# Altium PCB ESP32-C3FH4.PcbDoc
Units mil, origin at the board's own origin, x right, y up, seen from the top; angles counter-clockwise.
Board outline 1414.34 x 2244.79 mil, 4 copper layers (Top Layer, GND, POWER, Bottom Layer), stack 30.634 mil thick; 59 components, 54 nets, 271 pads, 143 vias.
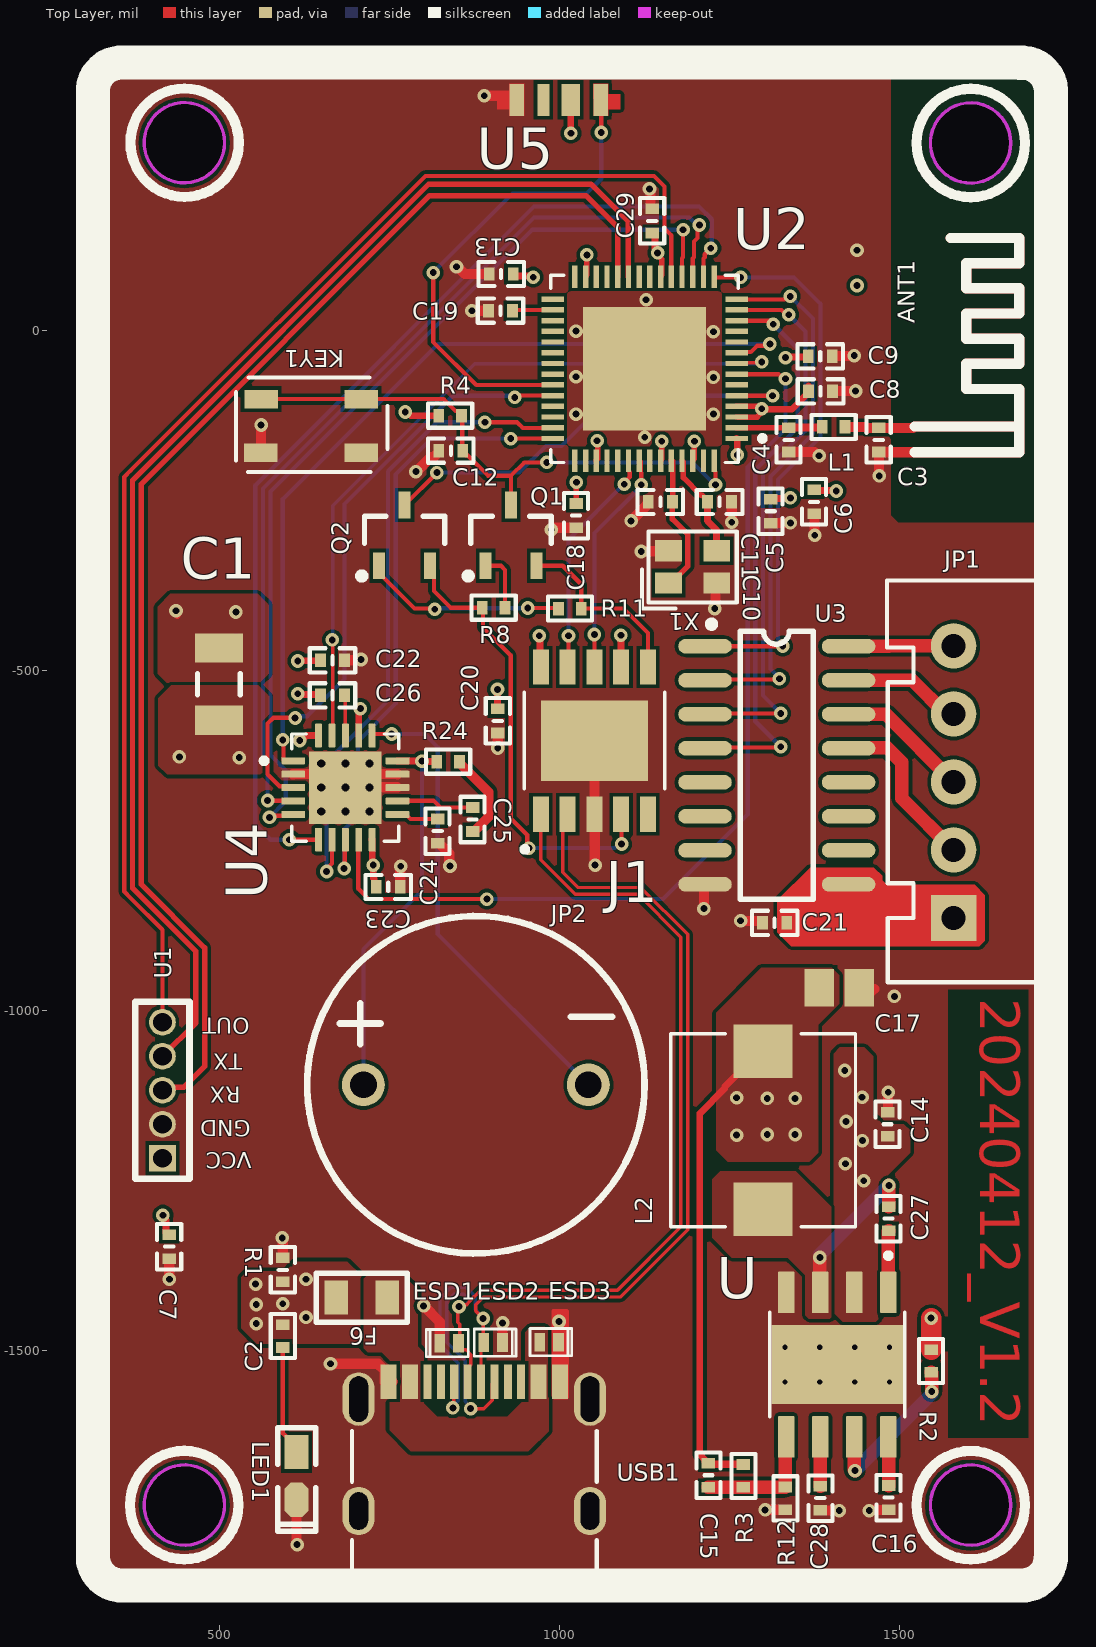
[diagram p0: Top Layer view]
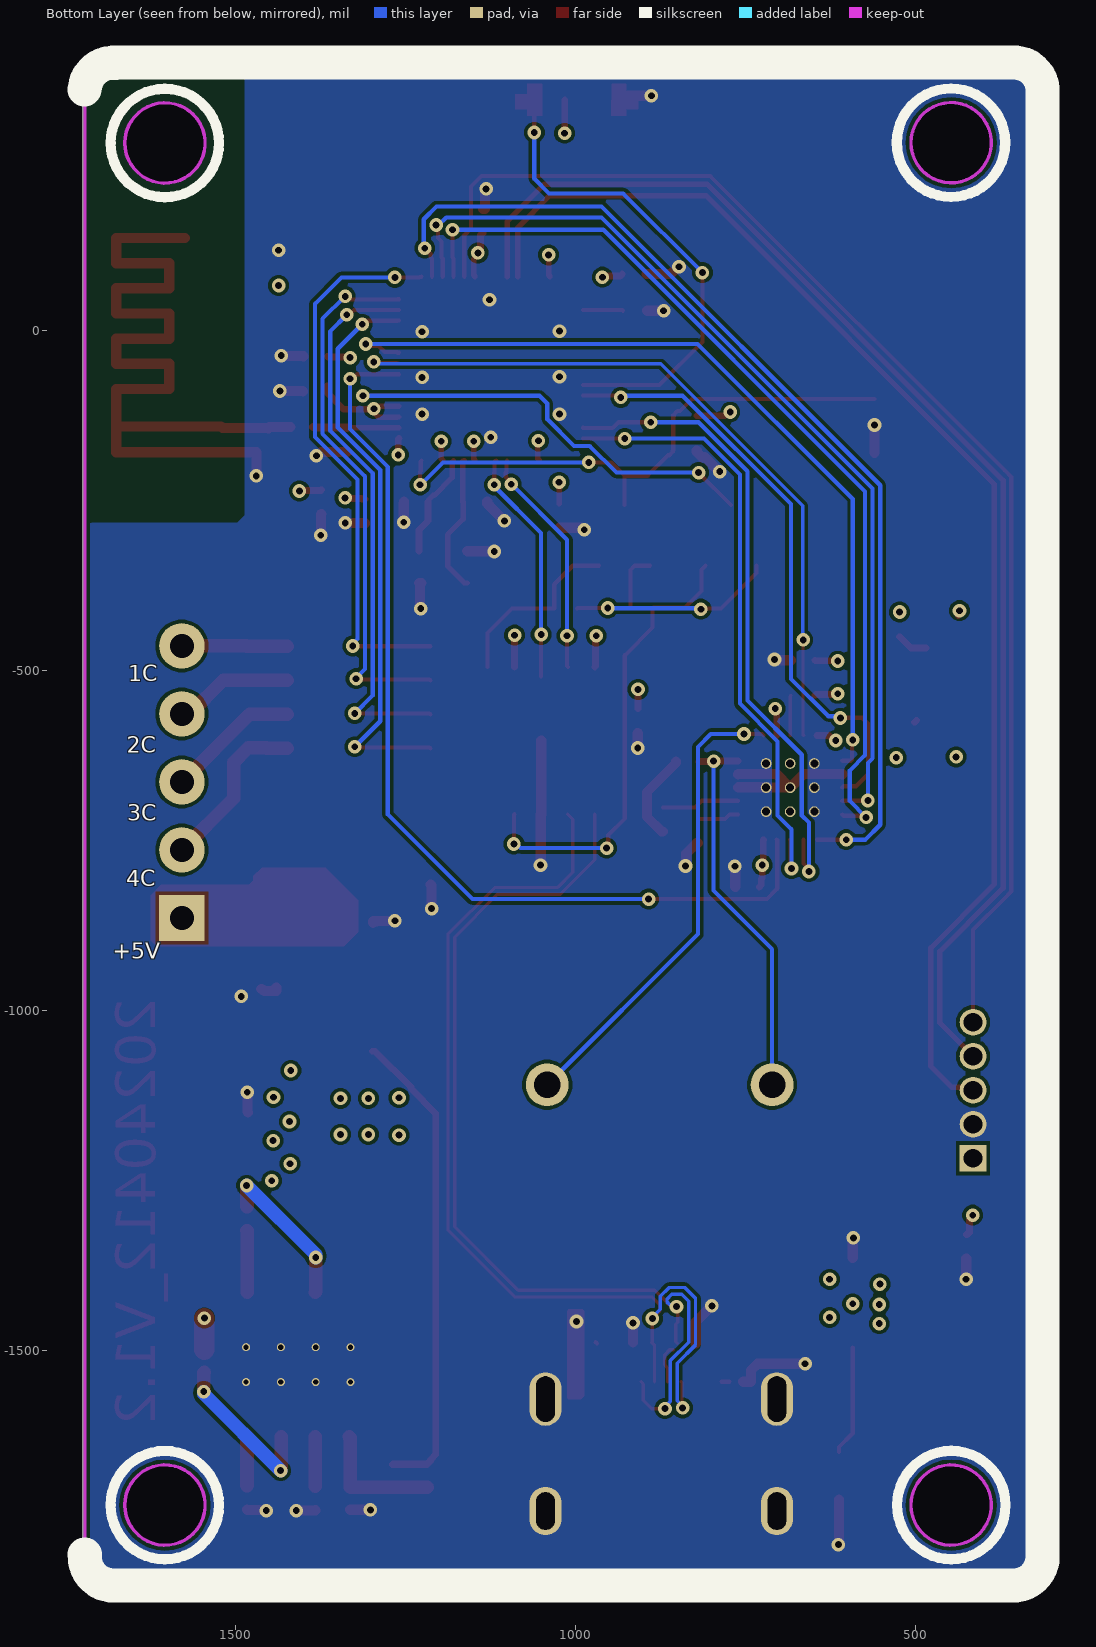
[diagram p1: Bottom Layer view, seen from below]
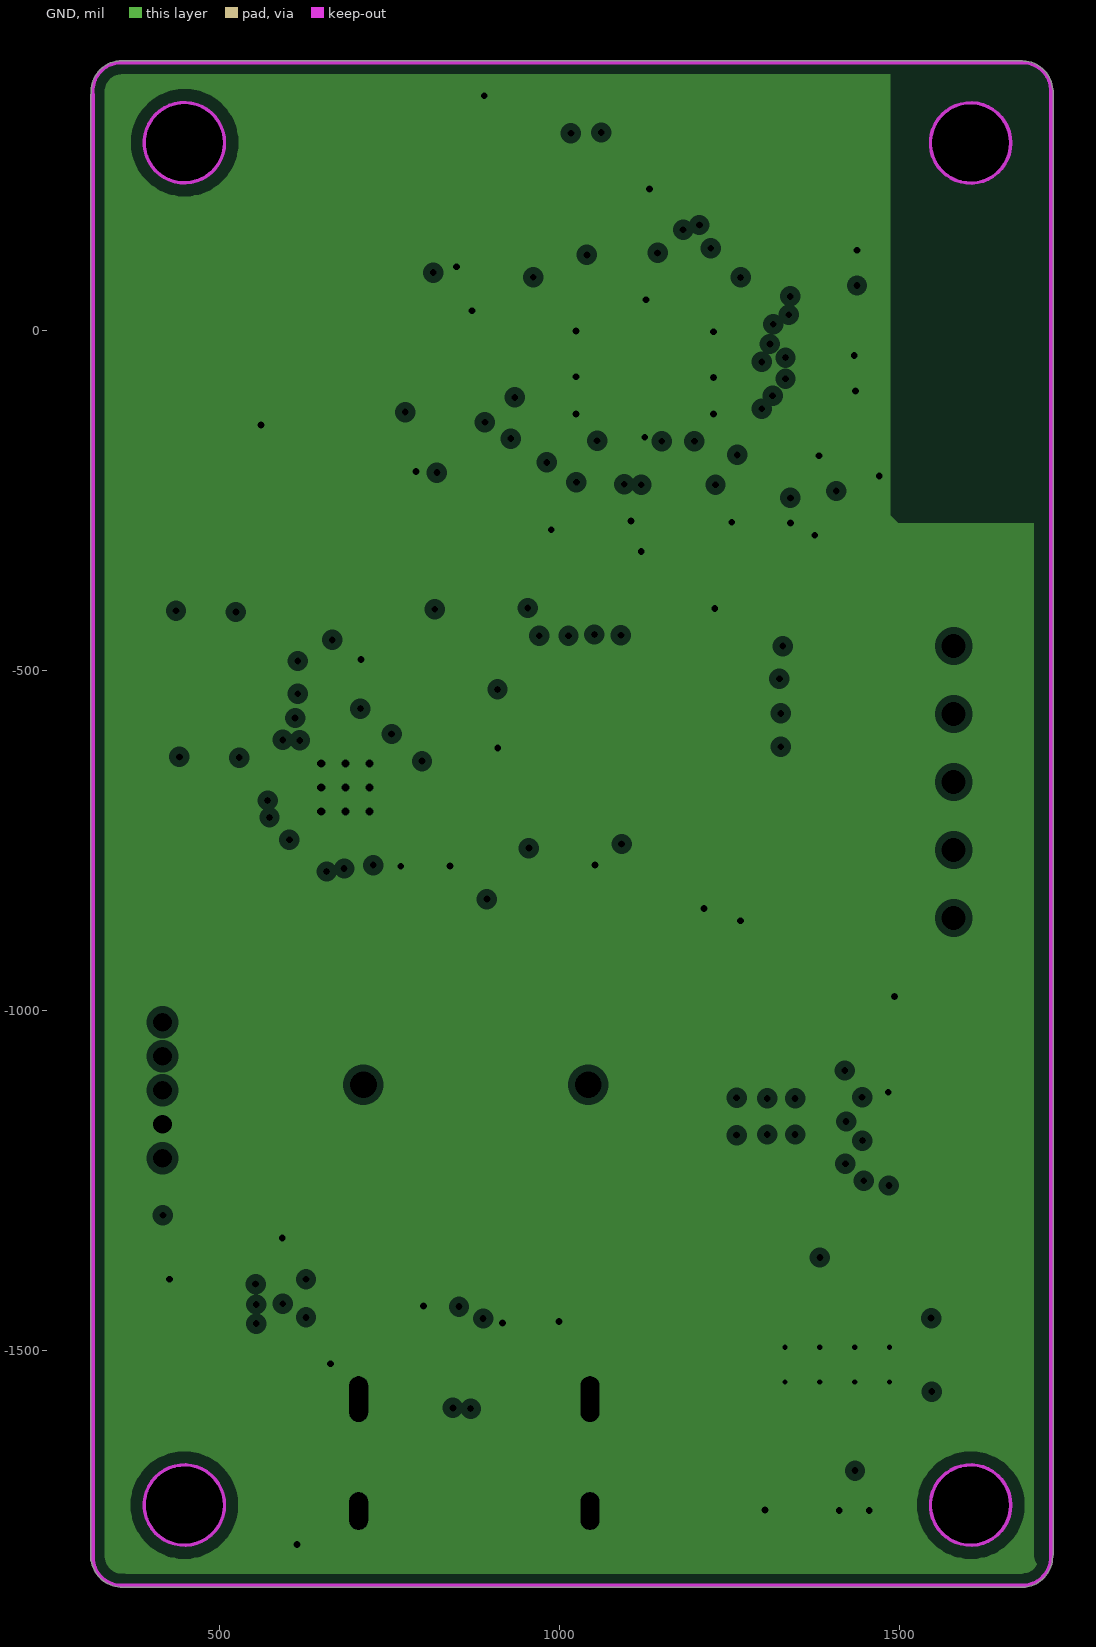
[diagram p2: GND, clearances drawn from the general rule]
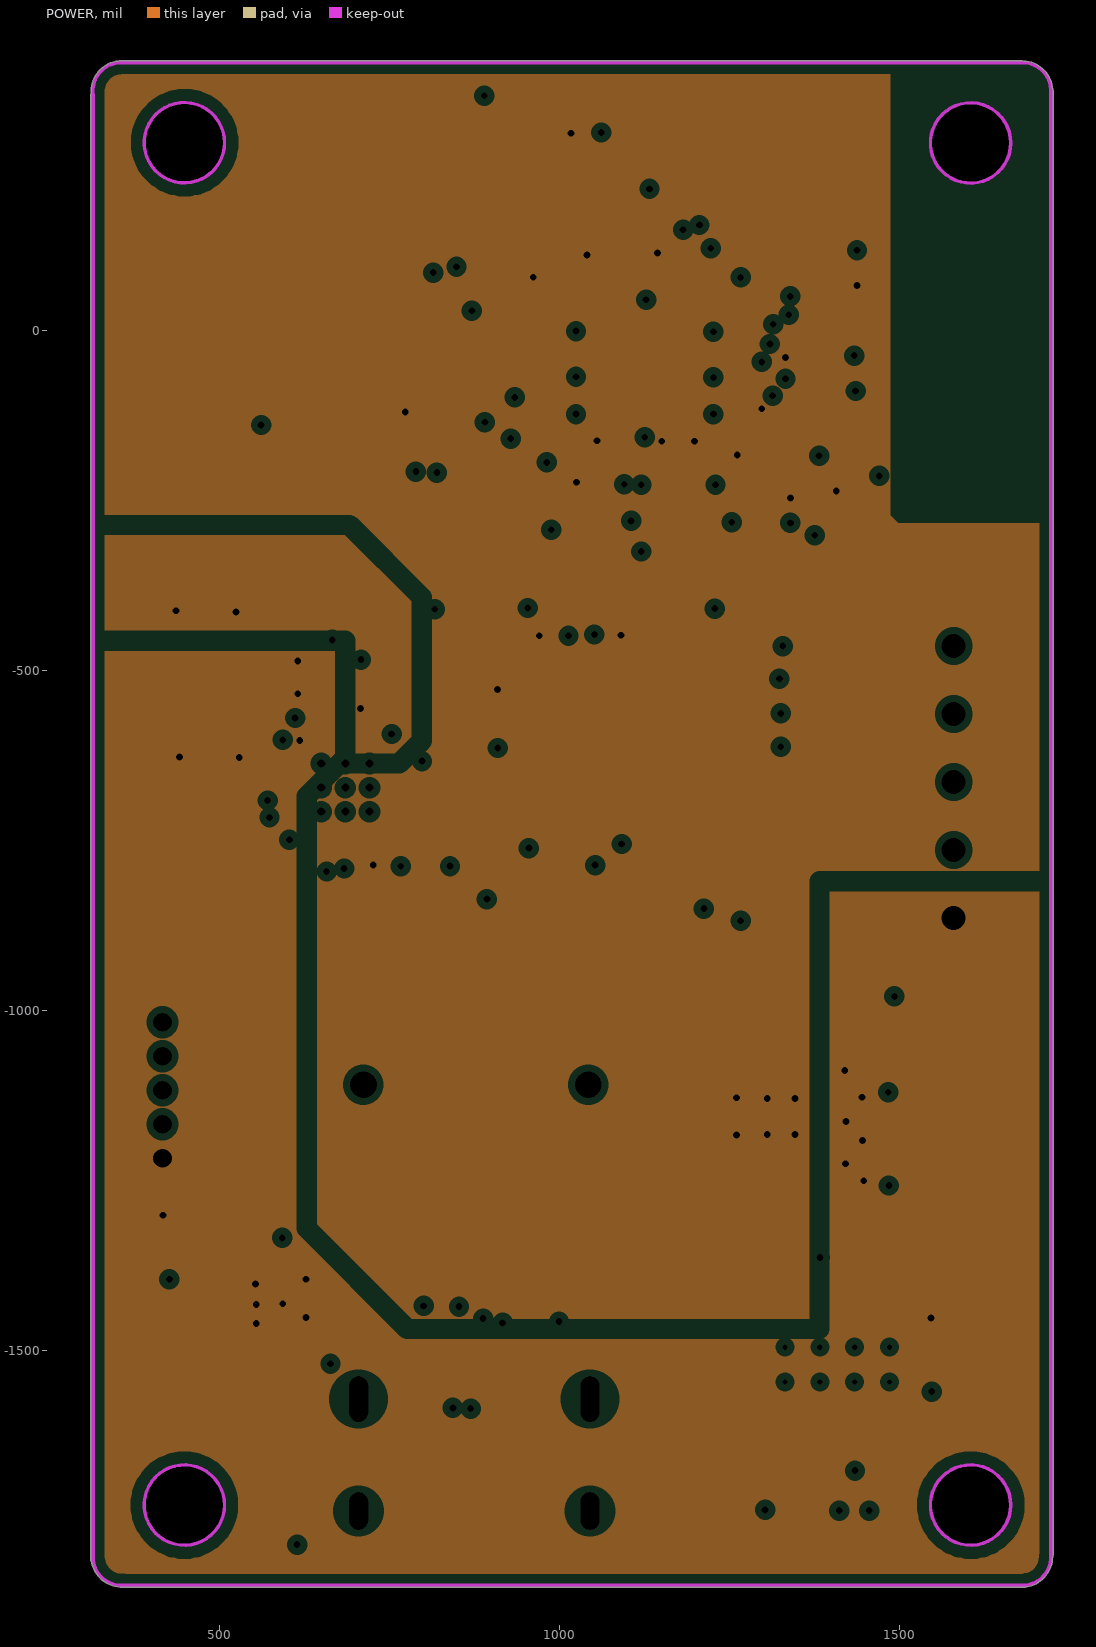
[diagram p3: POWER, clearances drawn from the general rule]
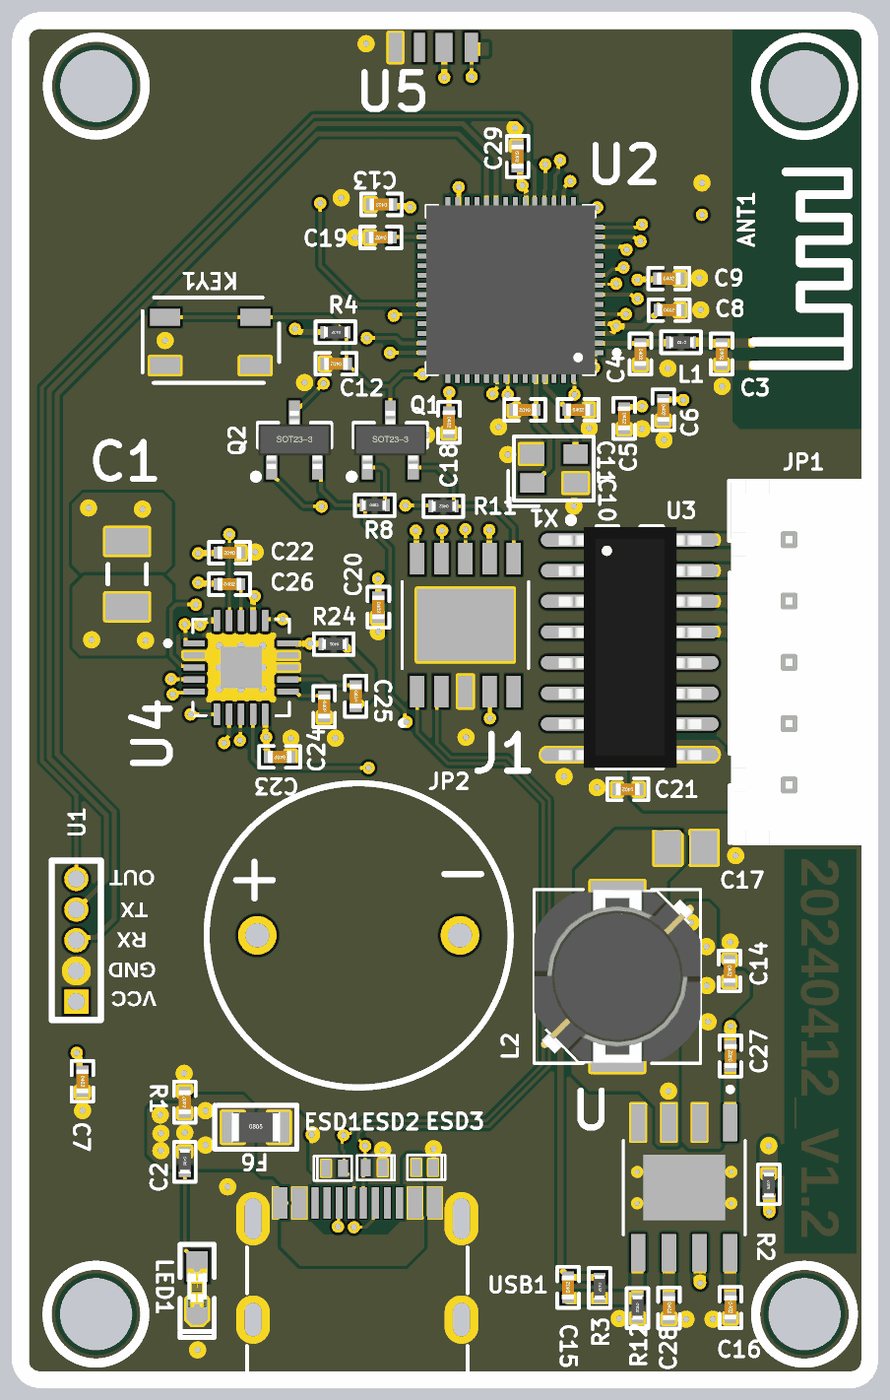
[diagram p4: 3D render of the assembled board from above, using the file's embedded part models]

## Layer stack, top to bottom
Top Solder: solder mask 0.4, Solder Resist, Dk 3.5
Top Layer: signal copper 1.4
Dielectric 1: core 10, FR-4, Dk 4.2
GND: plane copper 1.417, net GND
Dielectric 3: prepreg 5, Dk 4.2
POWER: plane copper 1.417, net (Multiple Nets)
Dielectric 2: core 10, Dk 4.2
Bottom Layer: signal copper 1.4
Bottom Solder: solder mask 0.4, Solder Resist, Dk 3.5

## Board outline
310.9,-1808.8 310.9,347.1 311.18,348.38 cw(c356,351.4) 350.97,396.04 353,396.8 1680.1,396.8 1682.1,396.07 cw(c1679.85,351.2) 1724.66,354.38 1725.25,352.5 1725.25,-1799.6 1724.57,-1802.6 cw(c1679.65,-1802.6) 1686.71,-1846.96 1684.4,-1847.99 359.3,-1848 357.62,-1847.5 cw(c356.3,-1802.6)
cut-out: 1604.41,-1785.87 cw(c1604.41,-1726.81) 1545.36,-1726.81 cw(c1604.41,-1726.81) 1604.41,-1667.76 cw(c1604.41,-1726.81) 1663.47,-1726.81 cw(c1604.41,-1726.81)
cut-out: 1604.41,216.53 cw(c1604.41,275.59) 1545.36,275.59 cw(c1604.41,275.59) 1604.41,334.64 cw(c1604.41,275.59) 1663.47,275.59 cw(c1604.41,275.59)
cut-out: 448.71,217.04 cw(c448.71,276.1) 389.66,276.1 cw(c448.71,276.1) 448.71,335.15 cw(c448.71,276.1) 507.77,276.1 cw(c448.71,276.1)
cut-out: 389.16,-1726.78 ccw(c448.21,-1726.78) 448.21,-1785.83 ccw(c448.21,-1726.78) 507.27,-1726.78 ccw(c448.21,-1726.78) 448.21,-1667.72 ccw(c448.21,-1726.78)

## Design rules (kind name [scope] priority, off if disabled: settings)
Clearance [All] p1: gap=5 ignorepadtopadclearanceinfootprint=FALSE
ComponentClearance [All] p1: gap=10 collisioncheckmode=3 verticalgap=10 showdistances=TRUE
DiffPairsRouting [All] p1: maxlimit=5 minlimit=5 mostfreqgap=5 toplayer_minwidth=5 toplayer_maxwidth=5 toplayer_prefwidth=5 bottomlayer_minwidth=5 bottomlayer_maxwidth=5 bottomlayer_prefwidth=5 maxuncoupledlength=500
PlaneClearance [All] p1: clearance=10
PlaneConnect [All] p1: planeconnectstyle=Direct reliefexpansion=20 reliefentries=4 reliefconductorwidth=10 reliefairgap=10
PolygonConnect [All] p1: connectstyle=Direct reliefconductorwidth=10 reliefentries=4 polygonreliefangle="90 Angle" airgapwidth=10
RoomDefinition ESP32-C3FH4 [InComponentClass('ESP32-C3FH4')] p1: confinementstyle=ConfineIn formatcopy=TRUE lockcomponents=FALSE outline -4267.3,-5848.65 -2267.3,-5848.65 -2267.3,-4848.65 -4267.3,-4848.65
RoutingVias [All] p1: holewidth=10 width=20 viastyle="Through Hole" minholewidth=10 minwidth=20 maxholewidth=10 maxwidth=20
SolderMaskExpansion [All] p1: expansion=4 istentingtop=FALSE
ViasUnderSMD [All] p1: allowed=FALSE
Width power [InNetClass('power')] p1: maxlimit=100 minlimit=12 preferedwidth=12
Width [All] p2: maxlimit=100 minlimit=5 preferedwidth=6
26 further rules are at their usual default settings.

## Classes and differential pairs
differential pair D: +D_P -D_N

## Components (designator, comment, footprint, x,y, rotation, side; value= is the part's Value field where it differs from the comment)
ANT1 "2.4G" 2.4GÌìÏß 1521.69,-176.1 r270 top
C1 "CA45A-A-25V-2.2UF-K" INDC3216 499,-520 r270 top value=2.2uF
C2 "0.1uF/25V" "C 0402_L" 593,-1381 r90 top
C3 "0.4pF/25V" "C 0402_L" 1469,-161 r270 top
C4 "0.4pF/25V" "C 0402_L" 1336.59,-161 r270 top
C5 "0.1uF/25V" "C 0402_L" 1310.12,-265.83 r270 top
C6 "10uF/10V" "C 0402_L" 1374,-252 r270 top
C7 "0.1uF/25V" "C 0402_L" 426,-1347 r270 top
C8 "10uF/10V" "C 0402_L" 1383.48,-89.44 r0 top
C9 "0.1uF/25V" "C 0402_L" 1383,-38 r0 top
C10 "20pF/25V" "C 0402_L" 1148,-252 r180 top
C11 "20pF/25V" "C 0402_L" 1235,-252 r0 top
C12 "1uF/10V" "C 0402_L" 839.93,-176.77 r180 top
C13 "0.1uF/25V" "C 0402_L" 914,83 r180 top
C14 "22uF/10V" "C 0402_L" 1482,-1167 r270 top value=15P
C15 "10pF/10V" "C 0402_L" 1218.6,-1683 r90 top value=15P
C16 "8.2nF/25V" "C 0402_L" 1483.5,-1715.92 r270 top
C17 "22uF/25V" C0805 1411,-966.11 r0 top
C18 "0.1uF/25V" "C 0402_L" 1024.15,-272.25 r270 top
C19 "0.1uF/25V" "C 0402_L" 913,29 r180 top
C20 "0.1uF/25V" "C 0402_L" 909,-574 r270 top
C21 "0.1uF/25V" "C 0402_L" 1316,-870.85 r180 top
C22 "0.1uF/25V" "C 0402_L" 666,-485 r180 top
C23 "10nF/25V" "C 0402_L" 748,-818 r180 top
C24 "0.1uF/25V" "C 0402_L" 820.56,-736 r270 top
C25 "330nF/25V" "C 0402_L" 872,-719 r270 top
C26 "15nF/25V" "C 0402_L" 666,-536.44 r0 top
C27 "0.1uF/10V" "C 0402_L" 1483.5,-1305.8 r90 top value=15P
C28 "1uF/25V" "C 0402_L" 1383.19,-1716.72 r270 top
C29 "0.1uF/25V" "C 0402_L" 1136,161 r90 top
ESD1 "ESD5311N-2/TR" X1-DFN1006-2_L1.0-W0.6-RD 837.42,-1488.88 r0 top
ESD2 "ESD5311N-2/TR" X1-DFN1006-2_L1.0-W0.6-RD 902.22,-1488 r180 top
ESD3 "ESD5311N-2/TR" X1-DFN1006-2_L1.0-W0.6-RD 984.42,-1487.4 r180 top
F6 "6V1A" "R 0805_L" 709,-1422 r0 top
J1 "CH340K" *SOP100P600X160-11N 1051,-603 r90 top
JP1 "HDR-1X5" XH2.54-LI-5P 1579.18,-663.78 r90 top
JP2 "超声波探头_C242180" SENSOR-TH_GU12XXC-40XX 876.76,-1109 r0 top
KEY1 "6*6*5" "TSW SMD-6*6*5" 734,-91 r180 top
L1 "0R1%" "R 0402_L" 1403.77,-141.8 r180 top
L2 "CLF7045T-3R3N-D" IND_CLF7045T-3R3N-D 1299,-1175.92 r270 top value=0R1%
LED1 "GREEN" "LED 0603B" 613,-1684 r270 top
Q1 "S8050" SOT23-3L 928.46,-301 r0 top
Q2 "S8050" SOT23-3L 772,-301 r0 top
R1 "1K" "R 0402_L" 593.01,-1477.42 r270 top
R2 "10K" "R 0402_L" 1546.06,-1516 r90 top
R3 "84.5K" "R 0402_L" 1270.05,-1683 r270 top
R4 "10K" "R 0402_L" 839.93,-125.33 r180 top
R8 "10K" "R 0402_L" 901.99,-407.56 r0 top
R11 "10K" "R 0402_L" 1015.99,-409 r180 top
R12 "25.5K" "R 0402_L" 1331.75,-1715.92 r270 top
R24 "200R" "R 0402_L" 837,-634 r180 top
U "TPS54339DDA" VREG_LM5017MR/NOPB 1408.05,-1520.38 r270 top locked
U1 "HLK-LD2410B" HDR-TH_5P-P1.27-V-M 416,-1117 r90 top
U2 "ESP32-S2FN4R2" QFN40P700X700X90-57N 1124.75,-56.42 r180 top
U3 "ULN2003" SOP16 1318.63,-639.33 r0 top
U4 "TUSS4470TRTJT" QFN50P400X400X80-21N 684.91,-672.09 r0 top
U5 "SK6812 SIDE-A" "SK6812 SIDE-A" 1165.32,372.57 r180 top
USB1 "C709357" USB-C-SMD_KH-TYPE-C-16P 874.5,-1640.5 r0 top
X1 "40MHz" "OSC 2016-4P" 1208,-337 r0 top

## Footprints (in the part's own frame and the unit in brackets; to place one, negate y for a bottom-side part, rotate by r counter-clockwise, add the part's x,y. Pads: shape width x height; smd on the part's side, far side on the other; paste and mask are expansions set on the pad)
2.4GÌìÏß [mil]
  rect 10x10 smd: 1(-35,0) 2(3,1)
  Top Layer lines w15: 3,0 3,1 3,154 -35,154 ; -35,0 -35,154 ; -312,53 -312,154 -275,154 -275,76 -238,76 -238,154 -201,154 -201,76 -164,76 -164,154 -127,154 -127,76 -90,76 -90,154 -35,154
  silkscreen extent -312,0 3,154
*SOP100P600X160-11N [mm]
  rect 1.31x0.6 smd: 1(-2.75,2) 2(-2.75,1) 3(-2.75,0) 4(-2.75,-1) 5(-2.75,-2) 6(2.75,-2) 7(2.75,-1) 8(2.75,0) 9(2.75,1) 10(2.75,2)
  rect 3x4 smd: 11(0,0)
  silkscreen extent -4.16,-2.62 1.8,2.7
C0805 [mm] "Chip Capacitor, Body 2.0x1.3mm, IPC High Density"
  rect 1.1x1.4 smd: 1(-0.75,0) 2(0.75,0)
  body extent -1.1,-0.72 1.1,0.72, height 1.4
"C 0402_L" [mm] "ÎÞ¼«ÐÔÌùÆ¬µçÈÝ"
  rect 0.4x0.5 smd: 1(-0.45,0) 2(0.45,0)
  silkscreen extent -0.85,-0.45 0.85,0.45, body extent -0.5,-0.26 0.5,0.26, height 0.53
HDR-TH_5P-P1.27-V-M [mm]
  rect 1x1 hole 0.7: 1(-2.54,0)
  round 1 hole 0.7: 2(-1.27,0) 3(0,0) 4(1.27,0) 5(2.54,0)
  silkscreen extent -3.3,-1.02 3.3,1.02
IND_CLF7045T-3R3N-D [mm]
  rect 2x2.2 smd: 1(-2.95,0) 2(2.95,0)
  silkscreen extent -3.6,-3.45 3.6,3.45, body extent -3.6,-3.45 3.6,3.45, height 4.8
INDC3216 [mm] "Chip Inductor, Body 3.2x1.6mm, IPC High Density"
  rect 1.1x1.8 smd: 1(-1.35,0) 2(1.35,0)
  silkscreen extent -0.4,-0.8 0.4,0.8, body extent -1.7,-0.9 1.7,0.9, height 0.55
"LED 0603B" [mil] "À¶É«0603LED"
  rect 50x35 smd: 1(-35,0.26)
  oct 50x35 smd: 2(35,0.26)
  silkscreen extent -71,-28 81,28, body extent -31,-16 32,16, height 24
"OSC 2016-4P" [mm]
  rect 1x0.8 smd: 1(-1.222,-0.872) 2(0.577,-0.871) 3(0.577,0.328) 4(-1.223,0.328)
  silkscreen extent -2.21,-1.83 1.33,1.06
QFN40P700X700X90-57N [mm]
  rect 0.84x0.2 smd mask+0.05: 1(-3.435,2.6) 2(-3.435,2.2) 3(-3.435,1.8) 4(-3.435,1.4) 5(-3.435,1) 6(-3.435,0.6) 7(-3.435,0.2) 8(-3.435,-0.2) 9(-3.435,-0.6) 10(-3.435,-1) 11(-3.435,-1.4) 12(-3.435,-1.8) 13(-3.435,-2.2) 14(-3.435,-2.6) 29(3.435,-2.6) 30(3.435,-2.2) 31(3.435,-1.8) 32(3.435,-1.4) 33(3.435,-1) 34(3.435,-0.6) 35(3.435,-0.2) 36(3.435,0.2) 37(3.435,0.6) 38(3.435,1) 39(3.435,1.4) 40(3.435,1.8) 41(3.435,2.2) 42(3.435,2.6)
  rect 0.2x0.84 smd mask+0.05: 15(-2.6,-3.435) 16(-2.2,-3.435) 17(-1.8,-3.435) 18(-1.4,-3.435) 19(-1,-3.435) 20(-0.6,-3.435) 21(-0.2,-3.435) 22(0.2,-3.435) 23(0.6,-3.435) 24(1,-3.435) 25(1.4,-3.435) 26(1.8,-3.435) 27(2.2,-3.435) 28(2.6,-3.435) 43(2.6,3.435) 44(2.2,3.435) 45(1.8,3.435) 46(1.4,3.435) 47(1,3.435) 48(0.6,3.435) 49(0.2,3.435) 50(-0.2,3.435) 51(-0.6,3.435) 52(-1,3.435) 53(-1.4,3.435) 54(-1.8,3.435) 55(-2.2,3.435) 56(-2.6,3.435)
  rect 4.6x4.6 smd paste-3: 57(0,0)
  silkscreen extent -4.5,-3.5 3.5,3.5, body extent -3.5,-3.5 3.5,3.5, height 0.9
QFN50P400X400X80-21N [mm]
  rrect25% 0.89x0.26 smd: 1(-1.945,1) 2(-1.945,0.5) 3(-1.945,0) 4(-1.945,-0.5) 5(-1.945,-1) 11(1.945,-1) 12(1.945,-0.5) 13(1.945,0) 14(1.945,0.5) 15(1.945,1)
  rrect25% 0.26x0.89 smd: 6(-1,-1.945) 7(-0.5,-1.945) 8(0,-1.945) 9(0.5,-1.945) 10(1,-1.945) 16(1,1.945) 17(0.5,1.945) 18(0,1.945) 19(-0.5,1.945) 20(-1,1.945)
  rect 2.7x2.7 smd paste-2: 21(0,0)
  round 0.4 hole 0.3 mask+0: 22(-0.9,0.9) 23(0,0.9) 24(0.9,0.9) 25(-0.9,0) 26(0,0) 27(0.9,0) 28(-0.9,-0.9) 29(0,-0.9) 30(0.9,-0.9)
  silkscreen extent -3.13,-2 2,2
"R 0402_L" [mm] "1/16WÌùÆ¬µç×è"
  rect 0.4x0.5 smd: 1(-0.4,0) 2(0.45,0)
  silkscreen extent -0.8,-0.45 0.85,0.45, body extent -0.5,-0.25 0.5,0.25, height 0.3
"R 0805_L" [mil] "1/8WÌùÆ¬µç×è"
  rect 35x50 smd: 1(-37.4,0) 2(37.4,0)
  silkscreen extent -67,-36 67,36, body extent -39,-25 39,25, height 20
SENSOR-TH_GU12XXC-40XX [mm]
  round 1.6 hole 1: 1(-4.2,0) 2(4.2,0)
  silkscreen extent -6.3,-6.3 6.3,6.3
"SK6812 SIDE-A" [mm]
  rect 0.55x1.2 smd: 1(2.667,0.855) 4(5.806,0.853)
  rect 0.7x1.2 smd: 2(3.789,0.858)
  rect 0.45x1.2 smd: 3(4.809,0.853)
  Top Layer region: 2.938,0.255 2.387,0.255 2.387,0.64 1.935,0.64 1.935,1.201 2.388,1.201 2.388,1.453 2.936,1.453
  Top Layer region: 5.53,1.452 6.081,1.452 6.081,1.204 6.533,1.204 6.533,0.647 6.08,0.647 6.08,0.254 5.532,0.254
SOP16 [mm] "£¨ËâÃ×¹¤·»£©"
  oval 2x0.55 smd: 1(-2.667,4.445) 2(-2.667,3.175) 3(-2.667,1.905) 4(-2.667,0.635) 5(-2.667,-0.635) 6(-2.667,-1.905) 7(-2.667,-3.175) 8(-2.667,-4.445) 9(2.692,-4.445) 10(2.692,-3.175) 11(2.692,-1.905) 12(2.692,-0.635) 13(2.692,0.635) 14(2.692,1.905) 15(2.692,3.175) 16(2.692,4.445)
  silkscreen extent -2.55,-5 1.37,5.39, body extent -2.92,-4.99 2.98,4.99, height 1.45
SOT23-3L [mm] "3x1.3x1mm(³¤¿í¸ß)"
  rect 0.45x1 smd: 1(-0.95,-1.143) 2(0.95,-1.143) 3(0,1.125)
  silkscreen extent -1.72,-1.65 1.5,0.7, body extent -1.5,-1.2 1.5,1.2, height 1.05
"TSW SMD-6*6*5" [mm] "6*6*5mm"
  rect 1.25x0.7 smd: 1(0.66,2.261) 2(0.66,0.254) 3(4.394,0.254) 4(4.4,2.261)
  silkscreen extent -0.33,-0.56 5.33,2.97
USB-C-SMD_KH-TYPE-C-16P [mm]
  oval 1.2x2 hole 0.7 slot 1.7 at 90 deg: 1(-4.32,1.765) 2(4.32,1.765)
  oval 1.2x1.8 hole 0.7 slot 1.4 at 90 deg: 3(-4.32,-2.415) 4(4.32,-2.415)
  rect 0.3x1.3 smd paste-100 mask+0.05: A1(-3.35,2.415) A4(-2.55,2.415) A5(-1.25,2.415) A6(-0.25,2.415) A7(0.25,2.415) A8(1.25,2.415) A9(2.55,2.415) A12(3.35,2.415) B1(3.05,2.415) B4(2.25,2.415) B5(1.75,2.415) B6(0.75,2.415) B7(-0.75,2.415) B8(-1.75,2.415) B9(-2.25,2.415) B12(-3.05,2.415)
  silkscreen extent -4.57,-5.08 4.57,0.57
VREG_LM5017MR/NOPB [mm]
  rrect5% 1.55x0.6 smd mask+0: 1(-2.7,1.905) 2(-2.7,0.635) 3(-2.7,-0.635) 4(-2.7,-1.905) 5(2.7,-1.905) 6(2.7,-0.635) 7(2.7,0.635) 8(2.7,1.905)
  rect 2.95x4.9 smd paste-3 mask+0: 9(0,0)
  round 0.3 hole 0.2: 10(-0.65,1.95) 11(0.65,1.95) 12(-0.65,0.65) 13(0.65,0.65) 14(-0.65,-0.65) 15(0.65,-0.65) 16(-0.65,-1.95) 17(0.65,-1.95)
  silkscreen extent -4.17,-2.52 1.95,2.52
X1-DFN1006-2_L1.0-W0.6-RD [mm]
  rect 0.4x0.7 smd paste+0 mask+0.051: 1(-0.35,0) 2(0.35,0)
  silkscreen extent -0.85,-0.51 0.71,0.51
XH2.54-LI-5P [mm] "½Ó²å¼þ£¬5P"
  rect 1.7x1.7 hole 0.9: 1(-5.08,0)
  round 1.7 hole 0.9: 2(-2.54,0) 3(0,0) 4(2.54,0) 5(5.08,0)
  silkscreen extent -7.48,-3.45 7.52,2.49, body extent -7.58,-3.3 7.58,2.4, height 7.03

## Part data
ANT1: library part ANT1, "PCB板载天线", BOM名称=PCB板载天线, 学习资源=www.ooocke.com, 版权归属=源创客
C1: library part "Cap Pol2", "Polarized Capacitor (Axial)", LatestRevisionDate=17-Jul-2002, LatestRevisionNote="Re-released for DXP Platform.", PackageDescription="Polarized Capacitor; 2 Leads", PackageReference=POLAR0.8, Published=8-Jun-2000, Publisher="Altium Limited"
C2 C3 C4 C5 C6 C7 C8 C9 C10 C11 C12 C13 C16 C17 C18 C19 C20 C21 C22 C23 C24 C25 C26 C28 C29: library part C
C14 C15 C27: library part Cap, "Capacitor", Manufacturer="Generic Components", Class=Passive, Published=08/06/2000, Publisher="Altium Hobart Technology Centre", SubClass=Capacitor
ESD1 ESD2 ESD3: library part tvs管
F6: library part JK-SMD0603-100L, JLCPCB Part Class="Extended Part", Manufacturer="Jinrui Electronic Materials Co.", Add into BOM=yes, Convert to PCB=yes, Device=JK-SMD0603-100L, Manufacturer Part=JK-SMD0603-100L, Name=6V1.5A, Origin Footprint=F0603, Supplier=LCSC, Supplier Part=C516069, Symbol=6V1A
J1: "USB to Serial Port Chip", Package=Package, Check_prices=https://www.snapeda.com/parts/CH340K/WCH/view-part/?ref=eda, MF=WCH, MP=CH340K, SnapEDA_Link=https://www.snapeda.com/parts/CH340K/WCH/view-part/?ref=snap
JP1: library part "Header 5", "5P接插件", BOM名称=5P接插件, 学习资源=www.ooocke.com, 版权归属=源创客
JP2: library part "Header 2", "2P接插件", BOM名称=2P接插件, 学习资源=www.ooocke.com, 版权归属=源创客
KEY1: library part "TSW DIP-6x6", "直插6x6轻触开关", BOM名称=直插6x6轻触开关, 学习资源=www.ooocke.com, 版权归属=源创客
L1 L2: library part L, Code_IEC=1005, Code_JEITA=0402, LatestRevisionDate=29-May-2009, LatestRevisionNote="IPC-7351 Footprint Added.", PackageDescription="Chip Inductor", PackageReference=0402-A, Published=8-Jun-2000, Publisher="Altium Limited"
LED1: library part LED-SH-5MM, "5mm草帽LED", BOM名称=5mm草帽LED, 学习资源=www.ooocke.com, 版权归属=源创客
Q1 Q2: Manufacturer=WPMtek(维攀微), Add into BOM=yes, Convert to PCB=yes, Device=S8050, Manufacturer Part=S8050, Name=S8050, Origin Footprint=SOT-23-3_L2.9-W1.3-P1.90-LS2.4-BR, Supplier=LCSC, Supplier Part=C2688231, Symbol=S8050
R1 R2 R3 R4 R8 R11 R12 R24: library part Res
U: library part TPS54339EDDA, "4.5V to 23V Input, 3A Synchronous Step-Down Converter with D-CAP2 Mode and Light Load Efficiency 8-SO PowerPAD -40 to 85", Package="HSOIC-8 Texas Instruments", Availability=Unavailable, MF="Texas Instruments", MP=TPS54339EDDA, Price=None, SnapEDA_Link=https://www.snapeda.com/parts/TPS54339EDDA/Texas%20Instruments/view-part/1156774/?ref=snap
U2: "RF System on a Chip - SoC SMD Wi-Fi IC ESP32-S2FN4R2, single-core MCU, 4 MB flash and 2 MB PSRAM inside, QFN 56-pin, 7*7 mm", Package="QFN-56 Espressif Systems", Check_prices=https://www.snapeda.com/parts/ESP32-S2FN4R2/Espressif+Systems/view-part/?ref=eda, MF="Espressif Systems", MP=ESP32-S2FN4R2, SnapEDA_Link=https://www.snapeda.com/parts/ESP32-S2FN4R2/Espressif+Systems/view-part/?ref=snap
U3: library part ULN2003-2, "达林顿驱动芯片", BOM名称=达林顿驱动芯片, 学习资源=www.ooocke.com, 版权归属=源创客
U4: "ULTRASONIC SENSOR I/F FOR PARK A", Package=None, Availability=Unavailable, MP=TUSS4470TRTJT, Price=None
U5: "INTEGRATED LIGHT SOURCE INTELLIGENT CONTROL OF / CHIP-ON-TOP SMD TYPE LED"
USB1: library part KH-TYPE-C-16P, Manufacturer="Shenzhen Kinghelm Elec", Add into BOM=yes, Convert to PCB=yes, Device=KH-TYPE-C-16P, Manufacturer Part=KH-TYPE-C-16P, Name=KH-TYPE-C-16P, Origin Footprint=USB-C-SMD_KH-TYPE-C-16P, Supplier=LCSC, Supplier Part=C709357, Symbol=KH-TYPE-C-16P
X1: library part XTAL-MC-4P, "MC系列4脚晶振", BOM名称=2脚无源脚晶振, 学习资源=www.ooocke.com, 版权归属=源创客

## Via types
v1: diameter 20, hole 10, Top Layer to Bottom Layer, 143 vias

## Nets (pads, with @x,y where several pads share a name; then routed paths per layer and width w, separated by ;. In a path a pad name is that pad's centre, name@x,y a point inside that pad or via, vN(x,y) a via of type N, cw(c..) or ccw(c..) an arc to the next point about the centre after c; other vN are vias at no path point)
1IN: U2.15 U3.1 | length 819.1
  Top Layer w6.16: U3.1 1213.8,-464.17 1327.77,-464.17 v1(1327.94,-464) ; U2.15 1227.46,78.47 1229,78.47 1229.47,78 v1(1266,78)
  Bottom Layer w6.16: v1(1266,78) 1344.61,78 1383.48,39.13 1383.48,-156.65 1321.02,-219.11 1321.02,-453.47 1327.94,-460.39 v1(1327.94,-464)
2IN: U2.14 U3.2 | length 798.8
  Top Layer w6.16: U3.2 1214.8,-513.17 1321.83,-513.17 v1(1323,-512) ; U2.14 1261.87,45.94 1262.21,45.6 1330.85,45.6 1335.25,50 v1(1339,50)
  Bottom Layer w6.16: v1(1323,-512) 1323,-511.08 1309.86,-497.93 1309.86,-214.49 1372.32,-152.03 1372.32,17.25 1339.57,50 v1(1339,50)
3.3V: C5.1 C6.1 C8.1 C9.1 C13.1 C15.2 C17.1 C18.1 C20.1 C23.2 C29.1 J1.7 J1.10 L2.1 R3.1 R4.2 U2.1 U2.3 U2.4 U2.20 U2.27 U2.45 U2.51 U2.54 U4.10 U5.2 | length 1610.2
  Top Layer w8: C18.1 1024.36,-254.32 1024.36,-223.41 v1(1024.58,-223.19) ; U2.27 1038.14,79.72 1040.01,81.6 v1(1040,111) ; U2.45 1053.89,-190.65 1055.71,-188.83 1055.71,-163.02 v1(1055,-162.31) ; v1(1144,114) 1144,110.75 1150.2,104.56 1150.2,81.63 1148.38,79.81 U2.20 ; U2.51 1148.38,-190.65 1150.2,-188.83 1150.2,-163.2 v1(1150,-163) ; U2.54 1195.62,-190.87 1197.57,-188.92 1197.57,-163.43 v1(1198,-163) ; U2.3 1262.04,-127.29 1262.38,-127.63 1290.37,-127.63 v1@1299.89,-118.11 ; U2.4 1261.87,-111.54 1261.94,-111.6 v1@1290.13,-111.6 ; v1@1290.13,-111.6 1293.38,-111.6 v1(1296.92,-115.14) 1293.67,-115.14 v1@1290.13,-111.6
  Top Layer w10: U4.10 724.39,-748.78 724.39,-784.39 v1(726,-786) 726,-805.24 727.41,-806.65 727.41,-815.12 C23.2 ; v1(773,-120) 775.71,-120 781.03,-125.33 R4.2 ; v1(908.58,-527.73) 908.79,-527.94 908.79,-556.08 C20.1 ; C13.1 934.5,80.22 959.09,80.22 v1(961,78.31) ; v1(970,-449) 971.13,-450.13 971.13,-493.6 J1.10 ; U5.2 1016.34,338.62 1016.34,290.02 v1(1016.51,289.85) ; v1(1090,-448) 1090.18,-448.18 1090.18,-494.55 J1.7 ; C29.1 1137.42,143.28 1140.3,140.41 1140.3,120.41 1144,116.71 v1(1144,114) ; C15.2 1219.58,-1666.27 R3.1@1269.06,-1666.27 ; U2.1 1261,-159.79 v1(1261,-183) ; R3.1 1218.59,-1667.25 1213.76,-1662.41 1213.76,-1660.44 1206,-1652.69 1206,-1150.86 1242.56,-1114.3 1242.56,-1112.28 1295.06,-1059.78 L2.1 ; v1(1296.92,-115.14) 1297.78,-116 1341.18,-116 1365.76,-91.41 C8.1@1365.76,-81.62 ; C5.1 1313.99,-248.12 1314.97,-247.14 1338.18,-247.14 v1(1339.16,-246.16) ; v1(1331.92,-40) 1332.92,-39 1364.28,-39 C9.1 ; C6.1 1374.86,-235.14 1405.57,-235.14 v1(1406.43,-236) ; v1@1436.34,66.66 v1(1437,66)
  other v1: 1260,-1183 1305,-1182 1346,-1182 1305,-1129 1346,-1129 1260,-1128
3IN: U2.13 U3.3 | length 824.5
  Top Layer w6.16: U3.3 1214.96,-563 v1(1325,-563) ; U2.13 1261.87,30.19 1262.21,29.85 1326.16,29.85 1333.01,23 v1(1336.76,23)
  Bottom Layer w6.16: v1(1325,-563) 1298.7,-536.7 1298.7,-209.87 1361.16,-147.41 1361.16,-1.4 v1(1336.76,23)
4IN: U2.12 U3.4 | length 845.9
  Top Layer w6.16: U3.4 1214.8,-613.17 1323.83,-613.17 v1(1325,-612) ; U2.12 1261.87,14.44 1262.21,14.1 1307.76,14.1 1312.86,9 v1(1314,9)
  Bottom Layer w6.16: v1(1314,9) 1350,-27 1350,-142.78 1287.54,-205.25 1287.54,-574.54 v1(1325,-612)
D_N: ESD2.2 J1.2 USB1.A7 USB1.B7 | length 1537.1
  Top Layer w5: v1(843,-1584) 843.98,-1583.01 843.98,-1546.4 USB1.B7 ; USB1.A7 884.34,-1492.1 ESD2.2 887.44,-1487 v1(887.44,-1452.53) 876.41,-1441.5 876.41,-1432.43 887.84,-1421 1089.14,-1421 1188,-1322.14 1188,-887.64 1119.36,-819 1027,-819 1004.42,-796.42 1004.42,-718.48 J1.2
  Bottom Layer w5: v1(843,-1584) 843,-1581.43 843.14,-1581.43 851,-1573.57 851,-1518.47 824.06,-1491.53 824.06,-1423.08 840.17,-1406.97 862.95,-1406.97 875.97,-1419.99 875.97,-1439.25 887.44,-1450.72 v1(887.44,-1452.53)
D_P: ESD1.2 J1.1 USB1.A6 USB1.B6 | length 1533.6
  Top Layer w5: ESD1.2 853,-1487.08 853,-1460.93 850.02,-1457.95 850.02,-1436.98 854.87,-1432.13 863.08,-1432.13 866.41,-1428.8 866.41,-1428.29 883.7,-1411 1085,-1411 1178,-1318 1178,-891.78 1115.22,-829 1022.86,-829 972.26,-778.4 J1.1 ; ESD1.2@856.57,-1498.54 862.33,-1498.54 869.5,-1505.71 869.5,-1520.89 864.66,-1525.73 USB1.A6 ; v1(869,-1585) 888.28,-1585 900.62,-1572.65 900.62,-1548.83 USB1.B6
  Bottom Layer w5: v1(852,-1435) 854.87,-1432.13 862.11,-1432.13 865.97,-1428.27 865.97,-1424.13 858.81,-1416.97 844.31,-1416.97 834.06,-1427.22 834.06,-1487.39 861,-1514.33 861,-1574.57 867.57,-1581.14 869,-1581.14 v1(869,-1585)
DTR: J1.4 Q2.2 R8.1 | length 685.3
  Top Layer w6.16: Q2.2 815.18,-351.78 815.18,-383.18 839.56,-407.56 R8.1 887.12,-408.44 887.12,-436.75 928.02,-477.66 928.02,-717.47 952.31,-741.76 952.31,-758.55 v1(954.76,-761) ; J1.4 1091,-711.9 v1(1091,-755)
  Bottom Layer w6.16: v1(954.76,-761) 1081.25,-761 1087.25,-755 v1(1091,-755)
EN: C12.1 KEY1.2 KEY1.3 Q1.3 R4.1 U2.56 | length 848.3
  Top Layer w6.16: KEY1.3 KEY1.2 829.43,-101 846.99,-118.56 850.89,-118.56 856.67,-124.34 856.67,-175.79 C12.1 857.65,-178.74 862.44,-183.53 864.41,-183.53 894.42,-213.54 928.46,-213.54 ; R4.1 R4.1@856.67,-126.31 ; Q1.3 928.46,-213.54 ; v1(981,-194) 948,-194 928.46,-213.54 ; U2.56 1227.97,-192.52 1227.97,-206.83 1229,-207.86 v1(1229,-227)
  Bottom Layer w6.16: v1(981,-194) 1195.41,-194 1228.41,-227 v1(1229,-227)
GND: ANT1.2 C2.2 C3.2 C4.2 C5.2 C6.2 C7.2 C8.2 C9.2 C10.2 C11.2 C12.2 C13.2 C14.1 C16.2 C17.2 C18.2 C19.2 C20.2 C21.2 C22.1 C23.1 C24.2 C28.2 C29.2 ESD1.1 ESD2.1 ESD3.1 J1.3 J1.11 KEY1.1 KEY1.4 LED1.2 R12.2 U1.2 U2.57 U3.8 U4.2 U4.13 U4.14 U4.21 U4.22 U4.23 U4.24 U4.25 U4.26 U4.27 U4.28 U4.29 U4.30 U5.4 U.4 U.9 U.10 U.11 U.12 U.13 U.14 U.15 U.16 U.17 USB1.1 USB1.2 USB1.3 USB1.4 USB1.A1 USB1.A12 USB1.B1 USB1.B12 X1.2 X1.4 | length 1831.2
  Top Layer w15: C7.2 426.12,-1364.84 426.12,-1394.62 v1(426.25,-1394.75) ; KEY1.4 561,-179.77 v1(561,-139) ; v1(592,-1334) 593,-1335 C2.2 ; U4.2 608.77,-651.97 664.58,-651.97 684.7,-672.09 U4.21 719.9,-672.09 720.34,-671.65 760.83,-671.65 761.26,-672.09 U4.13 ; LED1.2 613.26,-1784.26 v1(614,-1785) ; v1@664.35,-1519 732.69,-1519 742.61,-1528.92 USB1.A1 USB1.B12 ; C22.1 706.8,-485 v1(707.96,-483.84) ; U4.21@685.11,-672.09 705.23,-651.97 761.04,-651.97 U4.14 ; C23.1 765.72,-788.14 v1(766.22,-787.63) ; v1(788.57,-207.57) 789.14,-207.57 810.21,-186.49 814.47,-186.49 822.22,-178.74 C12.2 ; v1(800,-1434) 823.64,-1457.64 ESD1.1 ; C24.2 822.52,-753.71 837.76,-768.96 837.76,-786.46 v1(838.72,-787.42) ; v1(848.28,93.72) 849.64,93.72 860.35,83 C13.2 ; v1(871,29) C19.2@895.29,29 ; v1(889,345) 933.42,345 936.75,341.67 U5.4 ; v1(908.94,-613.9) 908.94,-591.77 C20.2 ; ESD2.1 v1(916,-1459) ; v1(987.52,-293.13) 988.87,-293.13 992.01,-289.98 C18.2@1021.81,-289.98 ; ESD3.1 998.57,-1487.03 998.57,-1457.43 v1(999,-1457) ; C18.2@1021.82,-289.96 C18.2 ; J1.11 J1.3 1051.5,-711.77 1051.5,-785.5 v1(1052,-786) ; v1(1105,-280) 1127.98,-257.02 1127.98,-256.27 1130.29,-253.97 C10.2 ; v1(1120,-325) 1120.46,-324.54 1159.4,-324.54 X1.4 ; v1(1132,208) 1132,206.65 1133.66,204.99 1133.66,179.09 1134.03,178.71 C29.2 ; v1(1212,-850) 1212,-815.96 U3.8 ; v1@1227.5,-408.5 v1(1228,-409) 1228.96,-408.04 1228.96,-373.47 1226.79,-371.31 X1.2 ; C11.2 1252.71,-254.2 1252.86,-254.35 1252.86,-281.86 v1(1253,-282) ; v1(1265.97,-867.97) v1@1268.26,-867.97 ; v1@1268.28,-867.98 1292.7,-867.98 1293.23,-868.5 1297.91,-868.5 1298.29,-868.88 C21.2 ; v1(1302,-1734) 1302.18,-1733.82 1331.56,-1733.82 R12.2 ; C5.2 1310.39,-283.27 1338.82,-283.27 v1(1339.1,-283) ; C4.2 1374.36,-178.71 1380,-184.35 v1(1381.35,-184.35) ; C6.2 1374.12,-269.71 1374.5,-270.09 1374.5,-300.5 v1(1375,-301) ; C28.2 1383.48,-1734.71 1410.71,-1734.71 v1(1411,-1735) ; C9.2 1400.71,-37.88 1401.09,-37.5 1432.5,-37.5 v1(1433,-37) ; C8.2 1401.42,-89.22 1434.78,-89.22 v1(1435,-89) ; v1@1436.62,118.38 v1(1437,118) ; C17.2 1440.53,-971 1458.64,-971 1461.65,-968 1463,-968 ; v1(1455,-1735) 1456.35,-1735 1457.34,-1734.01 1483.13,-1734.01 C16.2 ; C3.2@1469.39,-179.09 1476.48,-179.09 ANT1.2 ; C3.2@1469.45,-179.09 1469.45,-213.36 v1(1469.9,-213.81) ; C14.1 1482.13,-1149.28 1482.5,-1148.91 1482.5,-1120.5 v1(1483,-1120)
  other v1: 663,-1519 1492,-979 1125,-157 1125,-157 1024,-123 1226,-123 1226,-69 1024,-68 1226,-2 1024,-1 1127,45
IO0: Q2.3 U2.5 | length 674.3
  Top Layer w6.16: Q2.3 819.53,-209.18 v1(819.53,-208.99) ; U2.5 1261.87,-95.79 1261.98,-95.9 1312.9,-95.9 v1(1313,-96)
  Bottom Layer w6.16: v1(819.53,-208.99) 940.44,-208.99 979.69,-169.74 1002.83,-169.74 1042.08,-130.49 1042.08,-107.35 1053.43,-96 v1(1313,-96)
IO1: U2.41 U4.7 | length 951.1
  Top Layer w6.16: v1(657.38,-795.45) 657.38,-791.71 665.22,-783.87 U4.7 ; v1(890,-135) 937.41,-135 945.79,-143.38 989.18,-143.38 U2.41
  Bottom Layer w6.16: v1(657.38,-795.45) 657.38,-723.59 667.95,-713.02 667.95,-623.79 747.74,-544 747.74,-207.04 819.78,-135 v1(890,-135)
IO2: U2.42 U4.8 | length 906.5
  Top Layer w6.16: v1(683,-791) 683.95,-790.05 683.95,-749.62 U4.8 ; v1(928,-159) 928.06,-159.06 989.24,-159.06 U2.42
  Bottom Layer w6.16: v1(683,-791) 683,-733.4 703.39,-713.02 703.39,-604.14 758.9,-548.63 758.9,-211.67 811.57,-159 v1(928,-159)
LED: U2.37 U5.1 | length 724.3
  Top Layer w6.16: v1(814,85) 814,-17 877.39,-80.39 989.18,-80.39 U2.37 ; U5.1 1061.02,338.22 v1(1061.02,291)
  Bottom Layer w6.16: v1(814,85) 930.4,201.4 1039.4,201.4 1061.02,223.02 v1(1061.02,291)
NCS: U2.38 U4.3 | length 891.8
  Top Layer w6.16: U4.3 606.29,-670.05 588.18,-670.05 570.65,-652.52 570.65,-577.97 579.16,-569.46 610.74,-569.46 v1(611.05,-569.76) ; v1(934,-98.47) 936.65,-95.82 944.5,-95.82 ; 944.53,-95.79 U2.38
  Bottom Layer w6.16: v1(611.05,-569.76) 613.7,-567.11 628.89,-567.11 683.72,-512.28 683.72,-255.28 843,-96 931.53,-96 v1(934,-98.47)
NetANT1_1: ANT1.1 C3.1 L1.1 | length 104.2
  Top Layer w15: L1.1 1449.9,-141.8 1452.01,-143.91 1452.26,-143.66 1466.66,-143.66 1467.03,-143.28 1519.5,-143.28 ANT1.1
NetC1_1: C1.1 U4.17 | length 94.5
  Top Layer w10: v1(436,-412) 437.91,-413.91 v1@437.91,-419.54 ; C1.1@485.22,-466.85 507.35,-466.85 C1.1@524,-450.2 ; U4.17 704.59,-561.11 707,-558.71 v1(707,-556)
  other v1: 524,-414
NetC4_1: C4.1 L1.2 U2.2 | length 126.8
  Top Layer w8: U2.2 1262.14,-143.04 1262.43,-143.33 1336.54,-143.33 C4.1
  Top Layer w12: C4.1 1337.33,-142.54 1384.18,-142.54 1384.93,-141.8 L1.2
NetC10_1: C10.1 U2.52 X1.1 | length 204.7
  Top Layer w8: X1.1 1163.81,-371.32 1188.55,-346.57 1188.55,-300.34 1165.72,-277.5 C10.1 1165.94,-251.77 1165.94,-192.48 1164.95,-192.48 U2.52
NetC11_1: C11.1 U2.53 X1.3 | length 154.6
  Top Layer w8: U2.53 1181.76,-193.54 1181.76,-216.47 1207.82,-242.54 1209.79,-242.54 1217.28,-250.03 C11.1
  Top Layer w10: C11.1 1217.28,-279.88 1230.73,-293.32 X1.3
NetC15_1: C15.1 R3.2 R12.1 U.5 | length 187.4
  Top Layer w20: C15.1 R3.2 1331.2,-1700.71 R12.1 1331.75,-1627.99 U.5
NetC16_1: C16.1 U.8 | length 71.7
  Top Layer w20: U.8 1483.5,-1627.13 C16.1
NetC19_1: C19.1 U2.30 | length 59.3
  Top Layer w6.16: C19.1 931.57,29.85 989.18,29.85 U2.30
NetC24_1: C24.1 U4.11 | length 61.9
  Top Layer w6.16: U4.11 773.88,-711.46 780.71,-718.28 C24.1
NetC25_1: C25.1 U4.12 | length 114.8
  Top Layer w6.16: U4.12 761.92,-691.34 814.59,-691.34 824.53,-701.28 C25.1
NetC25_2: C25.2 R24.1 | length 131.2
  Top Layer w15: R24.1 852.75,-635.97 895.34,-678.56 895.34,-715.34 873.97,-736.71 C25.2
NetC26_2: C26.2 U4.18 | length 59.6
  Top Layer w5: C26.2 684.7,-537.43 684.7,-595.31 U4.18
NetC27_1: C27.1 U.1 | length 90.8
  Top Layer w20: U.1 1482.99,-1414.02 1482.99,-1324.02 C27.1
NetC27_2: C27.2 L2.2 U.3 | length 230.7
  Top Layer w20: v1(1382.48,-1362.91) 1382.48,-1413.51 U.3 ; C27.2 1483.5,-1257.5 v1(1484,-1257)
  Bottom Layer w20: v1(1382.48,-1362.91) 1382.48,-1358.52 v1(1484,-1257)
NetC28_1: C28.1 U.6 | length 72.4
  Top Layer w20: U.6 1382.99,-1626.74 1382.99,-1698.8 C28.1
NetESD3_2: ESD3.2 F6.2 USB1.A4 USB1.A9 USB1.B4 USB1.B9 | length 14.1
  Top Layer w6.16: USB1.A4 USB1.B9 ; ESD3.2@968.99,-1489.05 ESD3.2
NetJP1_2: JP1.2 U3.13 | length 247.9
  Top Layer w20: U3.13 1424.95,-614.02 1454.66,-614.02 1455.11,-613.57 1481.57,-613.57 1503,-635 1503,-687.69 1579.09,-763.78 JP1.2
NetJP1_3: JP1.3 U3.14 | length 195.7
  Top Layer w20: U3.14 1479.64,-564.33 1579.09,-663.78 JP1.3
NetJP1_4: JP1.4 U3.15 | length 175
  Top Layer w20: U3.15 1518.33,-514.33 1567.78,-563.78 JP1.4
NetJP1_5: JP1.5 U3.16 | length 154.8
  Top Layer w20: U3.16 1424.95,-464.02 1483.38,-464.02 1483.61,-463.78 JP1.5
NetLED1_1: LED1.1 R1.2 | length 162.3
  Top Layer w6.16: R1.2 593,-1621.25 613.26,-1641.5 LED1.1
NetQ1_1: Q1.1 R8.2 | length 86.7
  Top Layer w6.16: Q1.1 913.7,-346 919.71,-352.01 R8.2
NetQ2_1: Q2.1 R11.2 | length 297.6
  Top Layer w6.16: Q2.1 734.6,-356.83 786.77,-409 815.43,-409 v1(816.22,-409.78) ; v1(953,-408) 997.28,-408 R11.2
  Bottom Layer w6.16: v1(816.22,-409.78) 817.5,-408.5 952.5,-408.5 v1(953,-408)
NetR2_1: R2.1 U.7 | length 241.3
  Top Layer w20: U.7 1433.05,-1675.05 v1(1434.09,-1676.09) ; R2.1 1547,-1532.69 v1(1547,-1560)
  Bottom Layer w20: v1(1434.09,-1676.09) 1547,-1563.18 v1(1547,-1560)
OUT: U1.5 U2.19 | length 1945.5
  Top Layer w6.16: U1.5 416,-881 370,-835 359.92,-824.92 359.92,-215.5 370,-205.42 802.5,227.08 1138.49,227.08 1153.93,211.64 1153.93,149.98 1164.12,139.79 U2.19
OUT3: U2.9 U4.1 | length 1263.1
  Top Layer w6.16: v1(592.97,-601.9) 594.07,-603.01 594.07,-630.68 596.11,-632.72 U4.1 ; U2.9 1261.87,-32.8 1262.73,-31.94 1280.99,-31.94 1290.29,-22.65 1306.35,-22.65 v1(1309,-20)
  Bottom Layer w6.16: v1(592.97,-601.9) 592.97,-248.03 821,-20 1027.2,-20 1027.28,-20.08 1233.49,-20.08 1233.57,-20 v1(1309,-20)
OUT4: U2.8 U4.19 | length 1095
  Top Layer w5: U4.19 666.11,-594.62 666.11,-455.47 v1(665.64,-455) ; U2.8 1261.87,-48.55 1263.04,-47.38 1295.87,-47.38 v1(1297.04,-46.22)
  Bottom Layer w5: v1(665.64,-455) 666.2,-454.44 666.2,-257.84 875.04,-49 1294.25,-49 v1(1297.04,-46.22)
OUTA: JP2.1 R24.2 U4.15 | length 569.9
  Top Layer w10: U4.15 761.6,-632.84 774,-632.84 774.32,-633.15 v1(797.52,-633.15) 797.94,-633.58 818.87,-633.58 R24.2
  Bottom Layer w6.16: JP2.1@711.41,-1109 711.41,-909.59 797.52,-823.48 v1(797.52,-633.15)
OUTB: JP2.2 U4.16 | length 693.6
  Top Layer w6.16: U4.16 724.28,-595.39 726.31,-593.35 v1(752.82,-593.35)
  Bottom Layer w6.16: v1(752.82,-593.35) 801.63,-593.35 820.64,-612.36 820.64,-887.53 JP2.2@1042.11,-1109
RTS: J1.6 Q1.2 R11.1 | length 273.8
  Top Layer w6.16: Q1.2 1004.53,-346 1031.74,-373.22 R11.1@1031.74,-407.03 ; R11.1 1094,-409 1129.74,-444.74 J1.6
RXD: J1.9 U2.48 | length 341.8
  Top Layer w6.16: J1.9 1013,-493.36 v1(1013,-449) ; v1(1095,-226) 1095,-223.53 1103.02,-215.51 1103.02,-208.45 1101.99,-207.42 1101.99,-192.52 U2.48
  Bottom Layer w6.16: v1(1013,-449) 1013,-307.76 1094.76,-226 v1(1095,-226)
RXD_1: U1.4 U2.23 | length 1918.7
  Top Layer w8: U1.4 465,-1018 465,-912.92 382.08,-830 372,-819.92 372,-220.5 382.08,-210.42 807.5,215 1046,215 1101.07,159.93 U2.23 U2.23
SCLK: U2.17 U4.4 | length 1391.3
  Top Layer w6.16: v1(570.65,-691.08) 570.99,-691.43 607.98,-691.43 U4.4 ; U2.17 1195.62,105.79 1197.5,107.67 1197.5,130.62 1202.8,135.91 1202.8,152.27 v1(1205.45,154.92)
  Bottom Layer w6.16: v1(570.65,-691.08) 570.65,-635.98 563.73,-629.06 563.73,-232.19 962.08,166.16 1190.46,166.16 1201.7,154.92 v1(1205.45,154.92)
SDI: U2.18 U4.5 | length 1371
  Top Layer w6.16: v1(573.33,-715.94) 575.77,-713.5 606.29,-713.5 U4.5 ; U2.18 1179.87,106.14 1181.4,107.67 v1(1181.4,148.08)
  Bottom Layer w6.16: v1(573.33,-715.94) 597.24,-692.02 597.24,-646.79 574.89,-624.44 574.89,-236.81 959.78,148.08 v1(1181.4,148.08)
SDO: U2.16 U4.6 | length 1539.2
  Top Layer w6.16: v1(602.6,-748.66) U4.6 ; U2.16 1211.37,105.79 1213.25,107.67 1213.25,111.96 v1(1222.15,120.86)
  Bottom Layer w6.16: v1(602.6,-748.66) 574.45,-748.66 552.57,-726.78 552.57,-227.57 962.14,182 1205,182 1223.53,163.47 1223.53,122.23 v1(1222.15,120.86)
TXD: J1.8 U2.49 | length 347.8
  Top Layer w6.16: J1.8@1051,-508.71 v1(1051,-447) ; U2.49 1117.22,-192 1118.76,-192 1119.62,-192.86 1119.62,-209.38 1120,-209.76 v1(1120,-227)
  Bottom Layer w6.16: v1(1051,-447) 1051,-298 1120,-229 v1(1120,-227)
TXD_1: U1.3 U2.24 | length 1938.8
  Top Layer w8: U1.3 420.68,-1112.31 447.68,-1112.31 478,-1082 478,-907.53 385,-814.53 385,-225.89 808.89,198 1038.48,198 1085.38,151.09 U2.24
VIN5V: C1.2 C2.1 C7.1 C14.2 C21.1 C22.2 C26.1 F6.1 JP1.1 R1.1 R2.2 U1.1 U3.9 U4.20 U.2 | length 182.8
  Top Layer w10: v1(416.63,-1300.67) 416.63,-1303.38 421.16,-1307.9 421.16,-1326.41 424.03,-1329.28 C7.1 ; C1.2 C1.2@502,-576.15 ; v1(615,-534) 616.22,-535.22 647.07,-535.22 C26.1 ; v1(615,-486) 615.5,-485.5 647.79,-485.5 C22.2 ; v1(617.95,-602.77) 620.66,-602.77 627.92,-595.51 U4.20
  Top Layer w30: v1(1546,-1452) 1546.06,-1452.06 R2.2
  other v1: 554,-1460 627,-1451 554,-1432 593,-1431 553,-1402 627,-1395 1447,-1250 1420,-1225 1445,-1191 1421,-1163 1444.54,-1127.44 1419,-1088 529,-628 441,-627
VOUT: U2.7 U4.9 | length 1440.9
  Top Layer w6.16: U4.9 704,-749.25 704,-820.85 719.15,-836 v1(893,-836) ; U2.7 1261.87,-64.3 1321.47,-64.3 1328.17,-71 v1(1331.92,-71)
  Bottom Layer w6.16: v1(893,-836) 1152,-836 1276.38,-711.62 1276.38,-200.62 1331.92,-145.08 v1(1331.92,-71)
pads on no net: J1.5 U2.6 U2.10 U2.11 U2.21 U2.22 U2.25 U2.26 U2.28 U2.29 U2.31 U2.32 U2.33 U2.34 U2.35 U2.36 U2.39 U2.40 U2.43 U2.44 U2.46 U2.47 U2.50 U2.55 U3.5 U3.6 U3.7 U3.10 U3.11 U3.12 U5.3 USB1.A5 USB1.A8 USB1.B5 USB1.B8

## Polygon pours and split planes (outlines as drawn)
VIN5V on Top Layer "VIN5V_L01_P000" (solid, pour order 0): 557.16,-521.91 428.61,-521.91 409.89,-540.63 409.89,-639.63 422.89,-652.63 559.89,-652.63 572.89,-639.63 572.89,-537.63
NetC1_1 on Top Layer "NETC1_1_L01_P007" (solid, pour order 7): 556.28,-387.28 427.72,-387.28 409,-406 409,-505 422,-518 559,-518 572,-505 572,-403
GND on Top Layer "GND_L01_P009" (solid, pour order 9): 1722.15,352.5 1722.15,-1805.4 cw(c1682.65,-1805.4) 1682.65,-1844.9 353.28,-1844.9 cw(c353.28,-1805.62) 314,-1805.62 314,293.7 cw(c414,293.7) 414,393.7 1680.95,393.7 cw(c1680.95,352.5)
GND on Top Layer "GND_L01_P006" (solid, pour order 6): 1343.32,-1371.32 1361,-1389 1361,-1448 1368,-1455 1368,-1487 1309,-1487 1294,-1472 1294,-1384 1306.68,-1371.32
VIN5V on Top Layer "VIN5V_L01_P005" (solid, pour order 5): 709,-1390 688,-1369 611,-1369 597,-1383 541,-1383 532,-1392 532,-1467 555,-1490 704.49,-1490 709,-1485.49
3.3V on Top Layer "3.3V_L01_P004" (solid, pour order 4): 1380,-1021 1411,-990 1411,-948 1400,-937 1296,-937 1230,-1003 1230,-1205 1247,-1222 1367,-1222 1380,-1209
VIN5V on Top Layer "VIN5V_L01_P003" (solid, pour order 3): 1469,-1255 1515,-1209 1515,-1176 1506,-1167 1474.29,-1167 1461,-1153.71 1461,-1067 1448,-1054 1412,-1054 1403,-1063 1403,-1444 1418,-1459 1463,-1459 1469,-1453
NetC27_2 on Top Layer "NETC27_2_L01_P002" (solid, pour order 2): 1399,-1451 1399,-1288 1347,-1236 1236,-1236 1224,-1248 1224,-1334 1253,-1363 1335,-1363 1361,-1389 1361,-1448 1366,-1453 1397,-1453
NetESD3_2 on Top Layer "NETESD3_2_L01_P001" (solid, pour order 1): 738.17,-1501.83 738,-1502 718,-1502 712,-1496 712,-1394 717,-1389 770,-1389 791,-1410 791,-1493 800,-1502 800,-1577 820,-1597 923,-1597 949,-1571 949,-1473 957,-1465 978,-1465 984,-1471 984,-1618 954,-1648 781,-1648 750,-1617 750,-1513.65
GND on Bottom Layer "GND_L04_P008" (solid, pour order 8): 1722.15,352.5 1722.15,-1805.4 cw(c1682.65,-1805.4) 1682.65,-1844.9 353.28,-1844.9 cw(c353.28,-1805.62) 314,-1805.62 314,293.7 cw(c414,293.7) 414,393.7 1680.95,393.7 cw(c1680.95,352.5)
3.3V on POWER (split plane): 1487,-272 1498,-283 1705.15,-283 1705.15,-794.93 1382,-794.93 1379.06,-795.22 1376.23,-796.07 1373.63,-797.47 1371.34,-799.34 1369.47,-801.63 1368.07,-804.23 1367.22,-807.06 1366.93,-810 1366.93,-1452.93 782.24,-1452.93 643.07,-1313.76 643.07,-691.24 682.8,-651.52 684.91,-651.73 763.98,-651.73 766.92,-651.44 769.75,-650.58 772.35,-649.19 774.64,-647.31 778.46,-643.49 807.66,-614.29 809.53,-612.01 810.93,-609.4 811.78,-606.58 812.07,-603.64 812.07,-392 811.78,-389.06 810.93,-386.23 809.53,-383.63 807.66,-381.34 701.66,-275.34 699.37,-273.47 696.77,-272.07 693.94,-271.22 691,-270.93 331,-270.93 331,345.32 331.11,345.79 331.15,346.92 331.27,348.05 331.21,348.89 331.23,349.73 331.07,352.1 331.66,356.81 333.12,361.33 335.42,365.49 338.47,369.13 342.15,372.14 346.33,374.39 350.86,375.8 353.22,376.07 353.7,376.17 354.19,376.2 355.62,376.58 356.17,376.7 1487,376.7
VIN5V on POWER (split plane): 669.63,-622.06 617.34,-674.34 615.47,-676.63 614.07,-679.23 613.22,-682.06 612.93,-685 612.93,-1320 613.22,-1322.94 614.07,-1325.77 615.47,-1328.37 617.34,-1330.66 765.34,-1478.66 767.63,-1480.53 770.23,-1481.93 773.06,-1482.78 776,-1483.07 1382,-1483.07 1384.94,-1482.78 1387.77,-1481.93 1390.37,-1480.53 1392.66,-1478.66 1394.53,-1476.37 1395.93,-1473.77 1396.78,-1470.94 1397.07,-1468 1397.07,-825.07 1705.15,-825.07 1705.15,-1797.37 1704.96,-1798.2 1704.93,-1798.44 1704.86,-1798.68 1704.69,-1800.39 1704.48,-1802.11 1704.5,-1802.35 1704.47,-1802.6 1704.47,-1804.8 1703.7,-1809.13 1702.18,-1813.25 1699.96,-1817.04 1697.11,-1820.39 1693.71,-1823.18 1689.87,-1825.33 1685.72,-1826.77 1683.55,-1827.12 1682.9,-1827.29 1682.24,-1827.37 1681,-1827.78 1680.56,-1827.9 361.75,-1827.9 360.96,-1827.68 360.19,-1827.63 359.43,-1827.49 358.23,-1827.5 357.03,-1827.41 354.85,-1827.48 350.52,-1826.84 346.38,-1825.46 342.54,-1823.38 339.12,-1820.65 336.23,-1817.38 333.96,-1813.65 332.37,-1809.57 331.95,-1807.43 331.69,-1806.56 331.52,-1805.68 331.12,-1804.68 331,-1804.3 331,-471.07 669.63,-471.07
NetC1_1 on POWER (split plane): 781.93,-398.24 781.93,-597.39 757.74,-621.58 699.77,-621.58 699.77,-456 699.48,-453.06 698.63,-450.23 697.23,-447.63 695.36,-445.34 693.07,-443.47 690.47,-442.07 687.64,-441.22 684.7,-440.93 331,-440.93 331,-301.07 684.76,-301.07
GND on GND (split plane): 1487,-272 1498,-283 1697.07,-283 1697.07,-1799.6 1697.38,-1803.52 1698.3,-1807.35 1699.81,-1810.98 1701.7,-1814.07 1699.96,-1817.04 1697.11,-1820.39 1693.71,-1823.18 1689.87,-1825.33 1685.72,-1826.77 1683.55,-1827.12 1682.9,-1827.29 1682.24,-1827.37 1681,-1827.78 1680.56,-1827.9 361.75,-1827.9 360.96,-1827.68 360.19,-1827.63 359.43,-1827.49 358.23,-1827.5 357.03,-1827.41 354.85,-1827.48 350.52,-1826.84 346.38,-1825.46 342.54,-1823.38 339.12,-1820.65 336.23,-1817.38 333.96,-1813.65 332.37,-1809.57 331.95,-1807.43 331.69,-1806.56 331.52,-1805.68 331.12,-1804.68 331,-1804.3 331,345.32 331.11,345.79 331.15,346.92 331.27,348.05 331.21,348.89 331.23,349.73 331.07,352.1 331.66,356.81 333.12,361.33 335.42,365.49 338.47,369.13 342.15,372.14 346.33,374.39 350.86,375.8 353.22,376.07 353.7,376.17 354.19,376.2 355.62,376.58 356.17,376.7 1487,376.7

## Keep-outs
Keep-Out Layer:
  circle w5: c1604.04,275.59 r59.06
  circle w5: c1604.04,-1726.79 r59.06
  circle w5: c448.21,-1726.78 r59.06
  circle w5: c448.21,276 r59.06
  lines w5: 313.7,348.4 cw(c356,351.4) 353,393.7 ; 314,-1805.6 ccw(c356.3,-1802.6) 359.3,-1844.9 ; 1676.85,393.5 cw(c1679.85,351.2) 1722.15,354.2 ; 1682.65,-1844.9 ccw(c1679.65,-1802.6) 1721.95,-1799.6
  lines w6.16: 314,-1808.8 314,347.1 ; 353,393.7 1680.1,393.7 ; 359.3,-1844.9 1684.4,-1844.9 ; 1722.15,-1799.6 1722.15,352.5

## Other copper
Top Layer:
  region net VIN5V: 1481,-815 1474,-808 1474,-802 1462,-790 1368,-790 1320,-838 1320,-884.48 1340.52,-905 1617,-905 1625,-897 1625,-830 1610,-815
  pour cut-out: 1689,-969 1689,-1628 1571,-1628 1571,-969
  pour cut-out: 1495.04,394.04 1487,386 1487,-272 1498,-283 1712,-283 1722.15,-272.85 1722.15,372.55 1700.39,394.32 1693.13,394.32
  region net GND: 988,-1567 992,-1571 1011,-1571 1013,-1569 1013,-1441 1011,-1439 990,-1439 988,-1441
  text "20240412_V1.2" at 1599,-982 h100 r270
Bottom Layer:
  pour cut-out: 1495.04,394.04 1487,386 1487,-272 1498,-283 1712,-283 1722.15,-272.85 1722.15,372.55 1700.39,394.32 1693.13,394.32
GND (plane layer: these items are gaps in the copper):
  pour cut-out: 1495.04,394.04 1487,386 1487,-272 1498,-283 1712,-283 1722.15,-272.85 1722.15,372.55 1700.39,394.32 1693.13,394.32
  lines w50: 1722.15,-1799.6 1722.15,352.5
POWER (plane layer: these items are gaps in the copper):
  pour cut-out: 1495.04,394.04 1487,386 1487,-272 1498,-283 1712,-283 1722.15,-272.85 1722.15,372.55 1700.39,394.32 1693.13,394.32
  lines w30: 298.5,-230.5 305,-237 305,-456 ; 684.91,-636.65 763.98,-636.65 ; 767.8,-632.84 763.98,-636.65 ; 1712,-810 1382,-810 1382,-1468 776,-1468 628,-1320 628,-685 684.7,-628.3 684.7,-456 305,-456 ; 305,-456 315,-456 315,-286 691,-286 797,-392 797,-603.64 763.98,-636.65

## Silkscreen, mask and mechanical layers (free items; w line width, h text height)
Top Overlay:
  circle w15: c1604.3,-1726.9 r79.68
  circle w15: c1604.3,275.5 r79.68
  circle w15: c448.6,276.01 r79.68
  circle w15: c448,-1726.79 r79.68
  lines w50: 313.7,348.4 cw(c356,351.4) 353,393.7 1680.1,393.7 ; 314,-1809.8 314,346.1 ; 314,-1805.62 ccw(c356.3,-1802.62) 359.3,-1844.92 1684.4,-1844.9 ; 1676.85,393.5 cw(c1679.85,351.2) 1722.15,354.2 ; 1682.65,-1844.9 ccw(c1679.65,-1802.6) 1721.95,-1799.6 ; 1722.15,-1799.6 1722.15,352.5
  text "OUT" at 544.48,-1002.65 h40 r180
  text "TX" at 533,-1055 h40 r180
  text "RX" at 531,-1104 h40 r180
  text "GND" at 546,-1153 h40 r180
  text "VCC" at 547,-1200 h40 r180
Bottom Overlay:
  circle w15: c1604.2,-1726.9 r79.68
  circle w15: c1604.2,275.5 r79.68
  circle w15: c448.5,276.01 r79.68
  circle w15: c448,-1726.79 r79.68
  lines w50: 313.7,348.4 cw(c356,351.4) 353,393.7 1680.1,393.7 ; 314,-1808.8 314,347.1 ; 314,-1805.62 ccw(c356.3,-1802.62) 359.3,-1844.92 1684.4,-1844.9 ; 1676.85,393.5 cw(c1679.85,351.2) 1722.15,354.2 ; 1682.65,-1844.9 ccw(c1679.65,-1802.6) 1721.95,-1799.6
  text "1C" at 1657.8,-524 h40
  text "2C" at 1660.1,-629 h40
  text "3C" at 1659.8,-729 h40
  text "4C" at 1660.87,-825 h40
  text "+5V" at 1681,-932 h40

## Dimensions
1679.85,393.61 to 1684.4,-1844.9 on Top Overlay
1722.15,354.2 to 314,346.1 on Top Overlay